# Altium PCB Termination-Board-v1.0.1-PCB.PcbDoc
Units mil, origin at the board's own origin, x right, y up, seen from the top; angles counter-clockwise.
Board outline 2539.37 x 550.67 mil, 2 copper layers (Top Layer, Bottom Layer), stack 57 mil thick; 9 components, 4 nets, 26 pads, 11 vias.
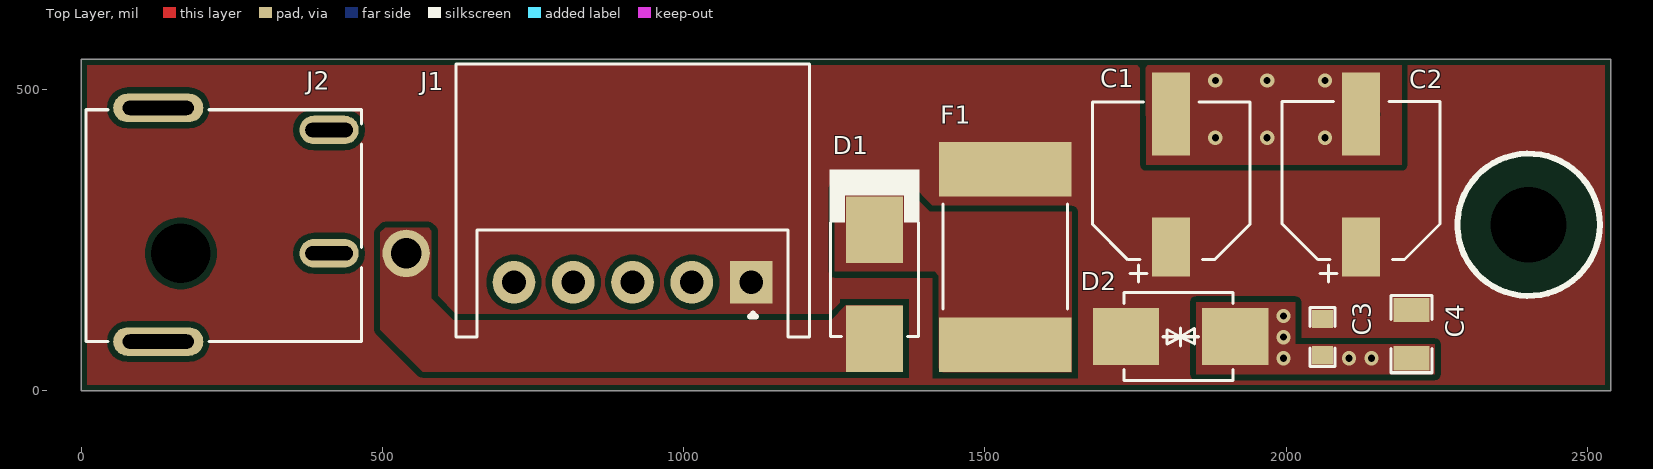
[diagram p0: Top Layer view]
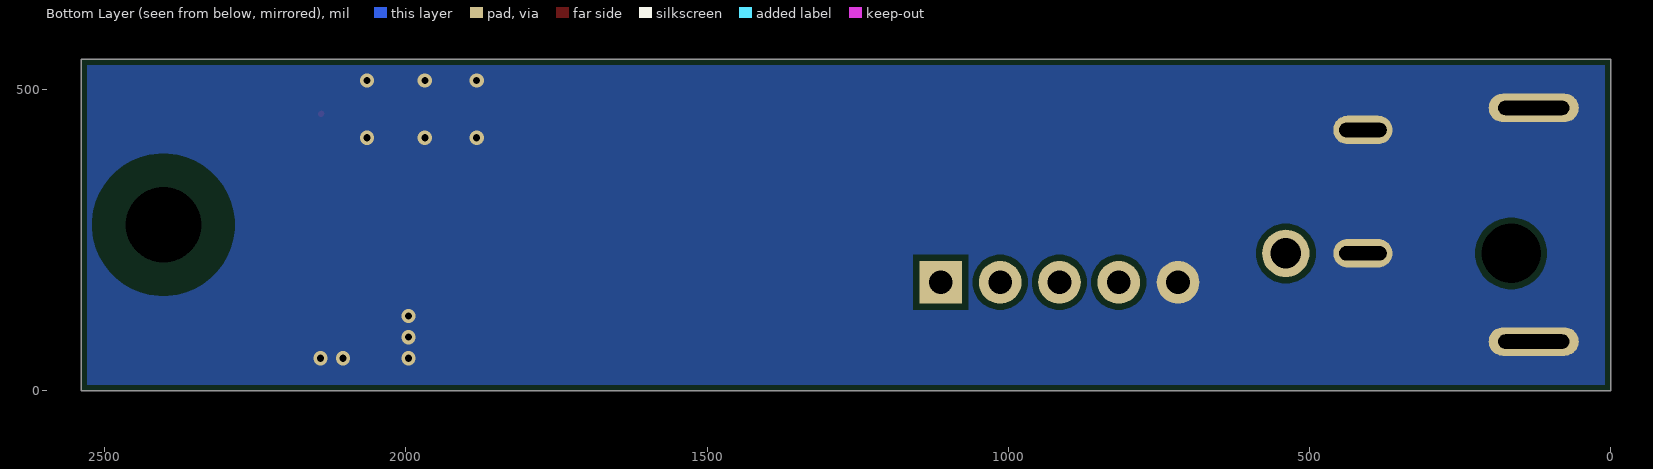
[diagram p1: Bottom Layer view, seen from below]
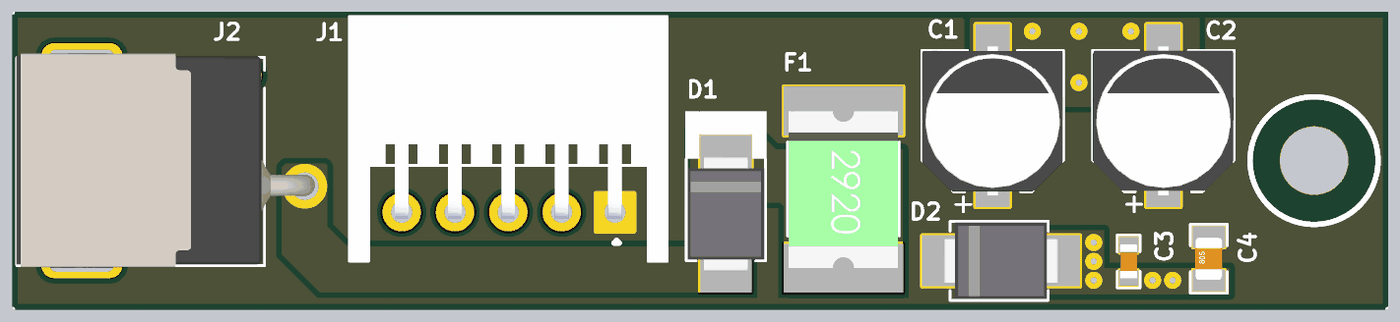
[diagram p2: 3D render of the assembled board from above, using the file's embedded part models]

## Layer stack, top to bottom
Top Solder: solder mask 3, Solder Resist, Dk 3.5
Top Layer: signal copper 10
Dielectric 1: dielectric 37, FR-4, Dk 4.8
Bottom Layer: signal copper 10
Bottom Solder: solder mask 3, Solder Resist, Dk 3.5

## Board outline
0,0 2539.37,0 2539.37,550.67 0,550.67

## Design rules (kind name [scope] priority, off if disabled: settings)
BoardOutlineClearance [All] p1: gap=0 ignorepadtopadclearanceinfootprint=FALSE except(10: Poly-OutlineEdge)
Clearance [All] p1: gap=10 ignorepadtopadclearanceinfootprint=FALSE
HoleSize [All] p1: absolutevalues=TRUE maxlimit=200 minlimit=1 maxpercent=80.000 minpercent=20.000
MinimumSolderMaskSliver [All] p1: minsoldermaskwidth=1.97
PolygonConnect [All] p1: connectstyle=Direct reliefconductorwidth=10 reliefentries=4 polygonreliefangle="90 Angle" airgapwidth=10
RoutingVias [All] p1: holewidth=28 width=50 viastyle="Through Hole" minholewidth=11.81 minwidth=23.62 maxholewidth=28 maxwidth=50
SilkToSolderMaskClearance [IsPad] p1: minsilkscreentomaskgap=0 clearancetoexposedcopper=TRUE
SolderMaskExpansion [All] p1: expansion=4 istentingtop=FALSE
SupplyNets "Schematic Supply Nets_1" [InNet('GND')] p1: voltage=0.000
SupplyNets "Schematic Supply Nets" [InNet('DC_24V')] p2: voltage=0.000
Width [All] p1: maxlimit=60 minlimit=5 preferedwidth=15 minimp=50.000000 maximp=50.000000 favimp=50.000000
27 further rules are at their usual default settings.

## Components (designator, comment, footprint, x,y, rotation, side; value= is the part's Value field where it differs from the comment)
C1 "47uF" RVT1H470M0607 1809.4,348.92 r90 top locked
C2 "47uF" RVT1H470M0607 2124.7,349 r90 top locked
C3 "0.1uF" Cap-0603 2060.4,88.94 r270 top
C4 "1uF" Cap-0805 2208.4,93.94 r90 top
D1 "SS510B" SMB_ 1317,177 r90 top
D2 "SMBJ26CA" "SMB Bi Directional" 1825,90 r180 top
F1 "BSMD2920-330-30V" Fuse-2920 1534,222 r90 top
J1 "S5B-XH-A(LF)(SN)" S5B-XH-A(LF)(SN) 915.43,180 r180 top locked
J2 "DC-044K-D025" DC-044K-D025 334,275.59 r0 top

## Footprints (in the part's own frame and the unit in brackets; to place one, negate y for a bottom-side part, rotate by r counter-clockwise, add the part's x,y. Pads: shape width x height; smd on the part's side, far side on the other; paste and mask are expansions set on the pad)
Cap-0603 [mil]
  rect 30x35 smd mask+2.36: 1(-30,0) 2(30,0)
  silkscreen extent -49,-21 49,21, body extent -32,-16 31,16, height 34
Cap-0805 [mil] "SMD 0805"
  rect 40x60 smd mask+2.76: 1(-40,0) 2(40,0)
  silkscreen extent -64,-34 64,34, body extent -39,-25 39,25, height 30
DC-044K-D025 [mm]
  oval 3.8x1.2 hole 0.6 slot 3 at 0 deg copper offset 0,0 paste-2539.97 mask+0.051: 1(-5.225,4.925)
  oval 2.5x1.2 hole 0.6 slot 2 at 0 deg copper offset 0,0.001 paste-2539.97 mask+0.051: 2(1.975,3.996)
  oval 2.5x1.2 hole 0.6 slot 2 at 0 deg copper offset 0,-0.001 paste-2539.97 mask+0.051: 3(1.975,-1.206)
  round 2 hole 1.3 paste-2539.97 mask+0.051: 4(5.225,-1.205)
  oval 3.8x1.2 hole 0.6 slot 3 at 0 deg paste-2539.97 mask+0.051: 6(-5.225,-4.925)
  round 0 hole 2.5 unplated paste-2539.97 mask+0.051: MH(-4.275,-1.205)
  silkscreen extent -8.27,-4.93 3.35,4.85, body extent -8.3,-5.03 5.7,5.07, height 7.3
Fuse-2920 [mm]
  rect 2.3x5.6 smd: 1(-3.7,0) 2(3.7,0)
  silkscreen extent -2.18,-2.62 2.24,2.62, body extent -3.68,-2.56 3.68,2.56, height 0.9
RVT1H470M0607 [mm]
  rect 2.5x1.6 smd: 1(-2.8,0)
  rect 3.5x1.6 smd: 2(2.8,0)
  silkscreen extent -4.27,-3.33 3.32,3.33, body extent -3.5,-3.3 3.5,3.3, height 7.7
S5B-XH-A(LF)(SN) [mm]
  rect 1.8x1.8 hole 1: 1(-5,0)
  round 1.8 hole 1: 2(-2.5,0) 3(0,0) 4(2.5,0) 5(5,0)
  silkscreen extent -7.45,-9.2 7.45,2.3, body extent -7.45,-9.2 7.45,2.3, height 6.1
"SMB Bi Directional" [mm]
  rect 2.8x2.4 smd: 1(-2.3,0) 2(2.3,0)
  silkscreen extent -2.21,-1.85 2.39,1.85, body extent -2.7,-1.8 2.7,1.8, height 2.3
SMB_ [mm]
  rect 2.8x2.4 smd: 1(-2.3,0) 2(2.3,0)
  silkscreen extent -2.21,-1.9 4.83,1.91, body extent -2.7,-1.8 2.7,1.8, height 2.3

## Part data
C1 C2: library part RVT1H470M0607, "47uF 50V 66mA@120Hz ±20% SMD,D6.3xL7.7mm Aluminum Electrolytic Capacitors - SMD ROHS", LCSC Part Number=C72523, Manufacturer=ROQANG, Package=SMD,D6.3xL7.7mm, ComponentLink1Description=LCSC, ComponentLink1URL=https://www.lcsc.com/product-detail/Aluminum-Electrolytic-Capacitors-SMD_ROQANG-RVT1H470M0607_C72523.html, Item Type=Capacitor, Manufacturer Part Number=RVT1H470M0607
C3: library part CC0603JRX7R9BB104, "CAP CER 0.1UF 50V X7R 0603", LCSC Part Number=C91183, Manufacturer=Yageo, ComponentLink1Description=https://datasheet.ciiva.com/11465/upy-gphc-x7r-6-3v-to-50v-8-11465038.pdf?src-supplier=Avnet, ComponentLink1URL=https://datasheet.ciiva.com/11465/upy-gphc-x7r-6-3v-to-50v-8-11465038.pdf?src-supplier=Avnet, Halogen Free=5694HalogenFree, Item Type=Capacitors, Lead Free=5697LeadFree, Manufacturer Part Number=CC0603JRX7R9BB104, Material=4241ConductorMaterial, Pins=2NUMBER, Pricing="4000=0.0077, 16000=0.0073, 60000=0.007, 160000=0.0068, 400000=0.0064 (USD)", RoHS=Yes, Stock=204000, Supplier="Future Electronics"
C4: library part GCM21BC72A105KE36L, "CAP CER 1UF 100V X7S 0805", Case Code (Imperial)=0805, Case Code (Metric)=2012, LCSC Part Number=C2842838, Manufacturer=Murata, Max Operating Temperature=125°C, Min Operating Temperature=-55°C, Ratings=AEC-Q200, Supplier Part Number 1=490-14436-1-ND, Tolerance=10%, Voltage Rating=100V, Capacitance=1uF, Case/Package=0805, Category="Ceramic Capacitors", ComponentLink1Description=http://search.murata.co.jp/Ceramy/image/img/A01X/partnumbering_e_02.pdf?src-supplier=Digi-Key, ComponentLink1URL=http://search.murata.co.jp/Ceramy/image/img/A01X/partnumbering_e_02.pdf?src-supplier=Digi-Key, Manufacturer Part Number=GCM21BC72A105KE36L, Mount="Surface Mount", Packaging="Cut Tape", Pricing 1="1=0.48000, 10=0.34100, 50=0.25800, 100=0.22480, 500=0.16650, 1000=0.14152 (USD)", RoHS=Yes, RoHS Compliant=Yes, Stock 1=179138, Supplier 1=Digi-Key
D1: "SCHOTTKY DIODE SMB 100V 5A", LCSC Part Number=C3011128, Manufacturer=MDD, Package=SMB, ComponentLink1Description=LCSC, ComponentLink1URL=https://www.lcsc.com/product-detail/Schottky-Barrier-Diodes-SBD_JUXING-SS510B_C3011128.html, Item Type=Diode, Manufacturer Part Number=SS510B
D2: "SMB(DO-214AA) TVS ROHS", LCSC Part Number=C5331111, Manufacturer=MSKSEMI, Package=SMB(DO-214AA), ComponentLink1Description=LCSC, ComponentLink1URL=https://www.lcsc.com/product-detail/TVS_MSKSEMI-SMBJ26CA_C5331111.html, Item Type=Diode, Manufacturer Part Number=SMBJ26CA
F1: "30V 3.3A 40A 6.6A 2920 Resettable Fuses ROHS", LCSC Part Number=C22368176, Manufacturer=BHFUSE, ComponentLink1Description=LCSC, ComponentLink1URL=https://www.lcsc.com/product-detail/Resettable-Fuses_BHFUSE-BSMD2920-330-30V_C22368176.html, Item Type=Fuse, Manufacturer Part Number=BSMD2920-330-30V, RoHS=No, Supplier=LCSC
J1: "CONN HEADER R/A 5POS 2.5MM", Current Rating=3A, Flammability Rating="UL94 V-0", Insulation Color=Natural, LCSC Part Number=C263757, Manufacturer=JST, Max Operating Temperature=85°C, Min Operating Temperature=-25°C, Voltage Rating=250V, ComponentLink1Description=https://datasheet.ciiva.com/16484/jst20s6b-xh-a-1-lf-sn-16484585.pdf?src-supplier=Future+Electronics, ComponentLink1URL=https://datasheet.ciiva.com/16484/jst20s6b-xh-a-1-lf-sn-16484585.pdf?src-supplier=Future+Electronics, ComponentLink2Description=https://datasheet.ciiva.com/726/exh-726399.pdf?src-supplier=Digikey, ComponentLink2URL=https://datasheet.ciiva.com/726/exh-726399.pdf?src-supplier=Digikey, ComponentLink3Description=https://datasheet.ciiva.com/8052/5448-8052216.pdf?src-supplier=Element14, ComponentLink3URL=https://datasheet.ciiva.com/8052/5448-8052216.pdf?src-supplier=Element14, Connector Type=Header, Contact Finish - Mating=TIN, Contact Material=Brass, Contact Plating=Tin, Contact Shape=Square, Contact Type="Male Pin", Fastening Type=Detent, Insulation Material=Nylon, Item Type="Headers and Wire Housings", Lead Free=5697LeadFree, Manufacturer Part Number=S5B-XH-A(LF)(SN), Mounting Technology="Through Hole", Number of Contacts=5, Number of Positions=5, Number of Rows=1, Orientation="Right Angle", Packaging=Bulk, Pitch=2.5mm, Pricing="1=0.145, 250=0.141, 1000=0.135, 2500=0.131, 10000=0.123 (USD)", Reach SVHC Compliant=No, RoHS=Yes, Series=XH, Stock=1881, Supplier="Future Electronics", Termination=Solder, Weight=4.535924g
J2: "Bend insert DC Power Receptacle -30℃~+85℃ 2.5mm 6mm 7A 24V Plugin DC Power Connectors ROHS", LCSC Part Number=C963204, Manufacturer=G-Switch, Package=Plugin, ComponentLink1Description=LCSC, ComponentLink1URL=https://www.lcsc.com/product-detail/DC-Power-Connectors_G-Switch-DC-044K-D025_C963204.html, Item Type="DC Power Connectors", Manufacturer Part Number=DC-044K-D025

## Free pads (board coordinates)
  round 0 hole 125.98: 5(2402.7,275.59)

## Via types
v1: diameter 23.62, hole 11.81, Top Layer to Bottom Layer, 11 vias

## Nets (pads, with @x,y where several pads share a name; then routed paths per layer and width w, separated by ;. In a path a pad name is that pad's centre, name@x,y a point inside that pad or via, vN(x,y) a via of type N, cw(c..) or ccw(c..) an arc to the next point about the centre after c; other vN are vias at no path point)
DC_24V: C1.1 C2.1 C3.1 C4.2 D2.2 F1.2 J1.1
GND: C1.2 C2.2 C3.2 C4.1 D2.1 J1.5 J2.1 J2.2 J2.3 J2.6 | length 1.3
  Top Layer w10: C2.2@2140.46,460.12 C2.2@2141.4,459.17
  other v1: 1996,54 2104.7,54 2141.7,54 1996,89 1996,124 1882.7,420 1968.7,420 2064.7,420 1882.7,515 1968.7,515 2064.7,515
NetD1_1: D1.1 J2.4
NetD1_2: D1.2 F1.1
pads on no net: J1.2 J1.3 J1.4 J2.MH

## Polygon pours and split planes (outlines as drawn)
DC_24V on Top Layer "NONET_L01_P-001" (solid, remove dead copper, pour order 21): 0,0 2539.37,0 2539.37,550.67 0,550.67
NetD1_1 on Top Layer "NONET_L01_P-001" (solid, pour order 20): 497.05,101.38 497.05,262.8 504.66,270.41 576.9,270.41 581.69,265.62 581.69,153.27 617.84,117.13 1245.08,117.13 1269.68,141.73 1363.19,141.73 1363.19,31.5 566.93,31.5
GND on Top Layer "NONET_L01_P-001" (solid, pour order 14): 1851,27.77 2246.7,27.77 2246.7,77 2015,77 2015,147 1851,147
NetD1_2 on Top Layer "NONET_L01_P-001" (solid, pour order 12): 1417,198 1423.76,191.24 1423.76,37.44 1430.15,31.06 1644.24,31.06 1644.24,121.61 1644,121.84 1644,251 1644,297 1409,297 1370,336 1251,336 1251,198
GND on Top Layer "NONET_L01_P-001" (solid, pour order 9): 2005.76,77 2246.7,77 2246.7,27.77 2005.38,27.77
GND on Top Layer "NONET_L01_P-001" (solid, pour order 7): 1766.99,540 2120.7,540 2191.7,540 2191.7,375 1767.7,375
GND on Bottom Layer "NONET_L01_P-001" (solid, remove dead copper, pour order 19): 0,0 2539.37,0 2539.37,550.67 0,550.67

## Other copper
Top Layer:
  pour cut-out: 2284.59,275.59 ccw(c2402.7,275.59) 2402.7,157.48 ccw(c2402.7,275.59) 2520.81,275.59 ccw(c2402.7,275.59) 2402.7,393.7 ccw(c2402.7,275.59)
Bottom Layer:
  pour cut-out: 2284.59,275.59 ccw(c2402.7,275.59) 2402.7,157.48 ccw(c2402.7,275.59) 2520.81,275.59 ccw(c2402.7,275.59) 2402.7,393.7 ccw(c2402.7,275.59)

## Silkscreen, mask and mechanical layers (free items; w line width, h text height)
Top Overlay:
  circle w10: c2402.7,275.59 r118.11
Board Outline:
  the board outline again, w10

## Dimensions
0,0 to 2539.37,0 on Top Overlay
0,551 to 0,0 on Top Overlay